# Altium PCB auto-psu.PcbDoc
Units mm, origin at the board's own origin, x right, y up, seen from the top; angles counter-clockwise.
Board outline 120 x 82.5 mm, 2 copper layers (Top Layer, Bottom Layer); 47 components, 30 nets, 121 pads, 1 vias.
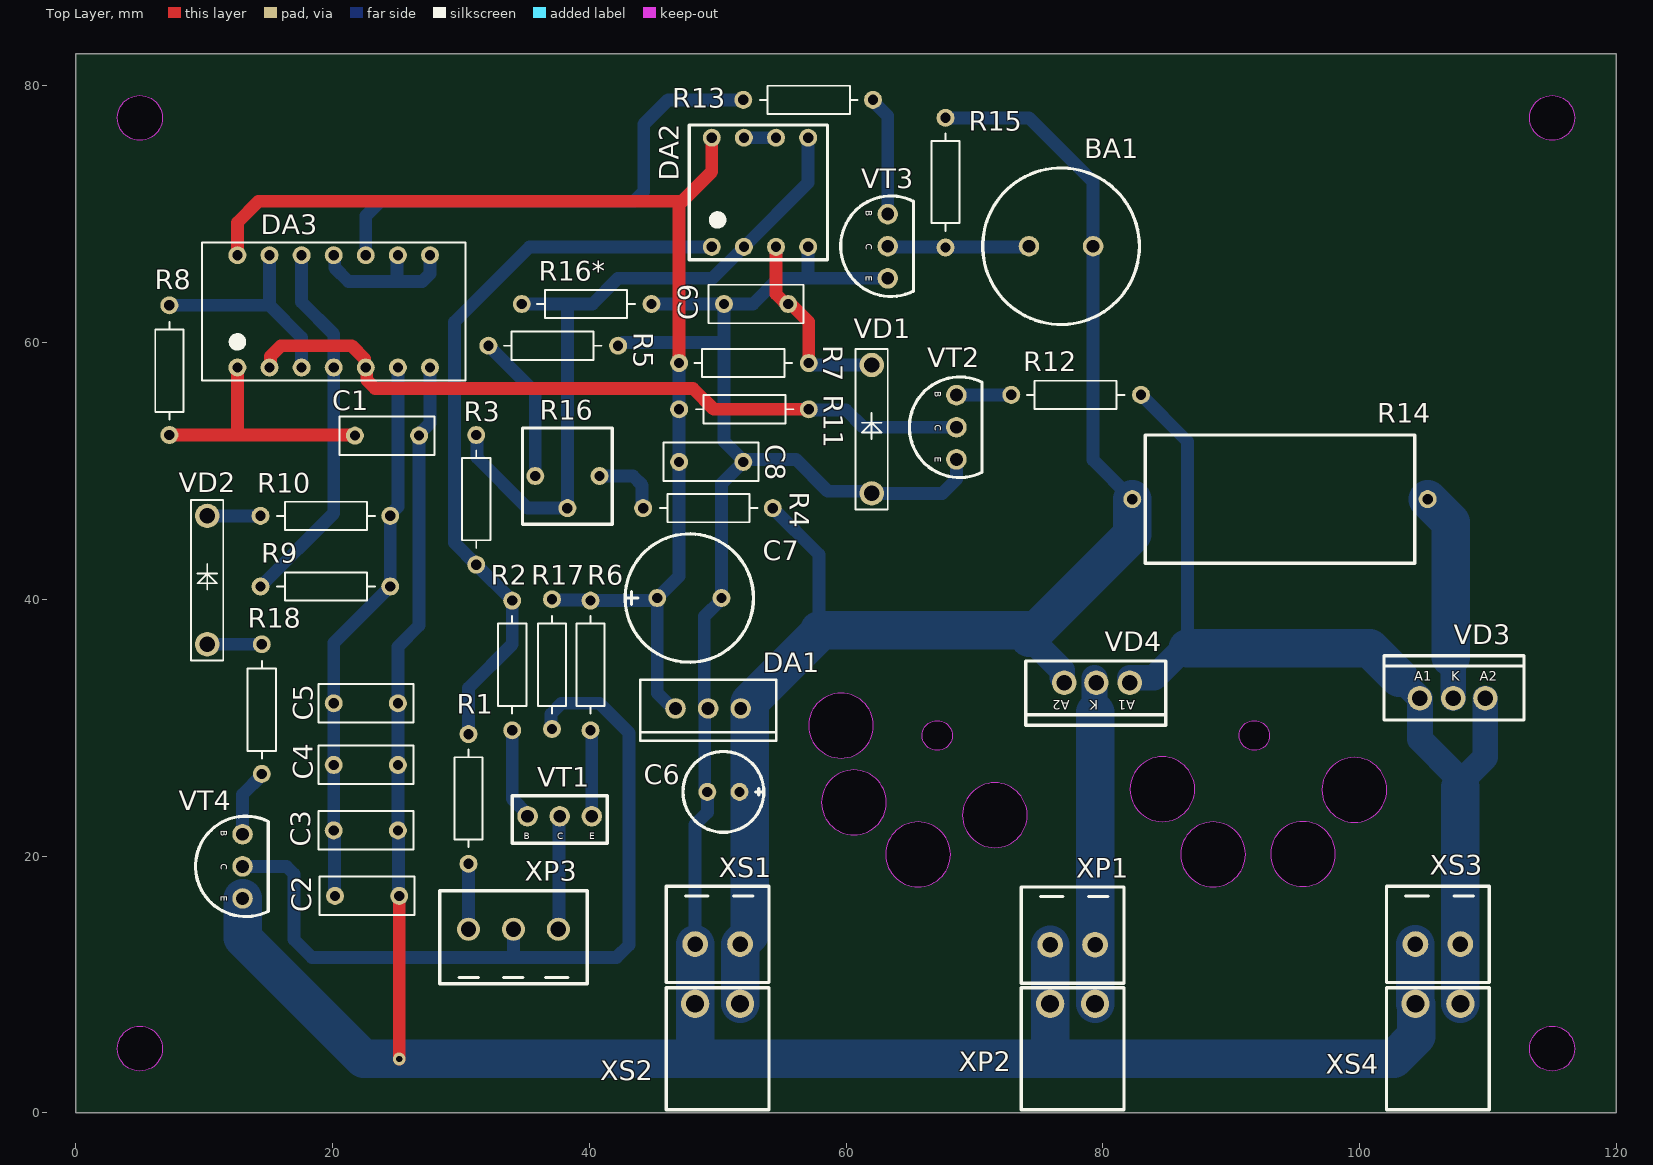
[diagram p0: Top Layer view]
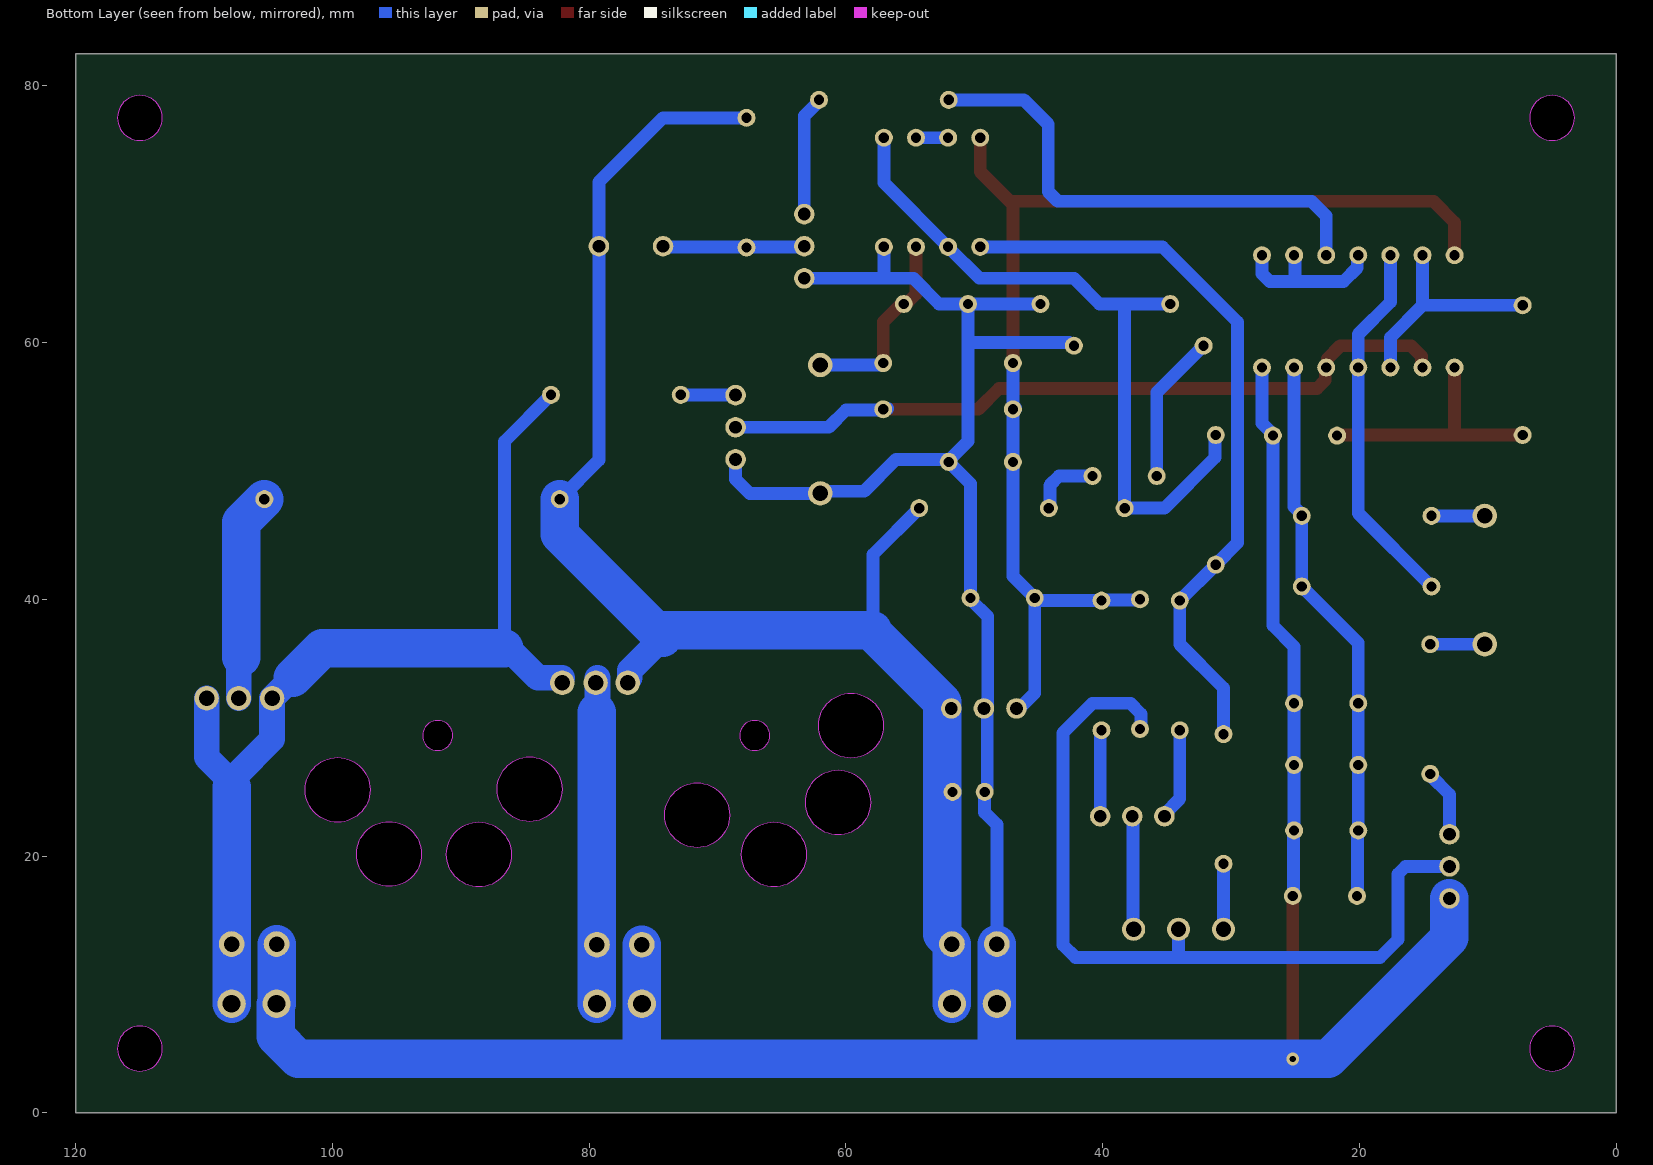
[diagram p1: Bottom Layer view, seen from below]
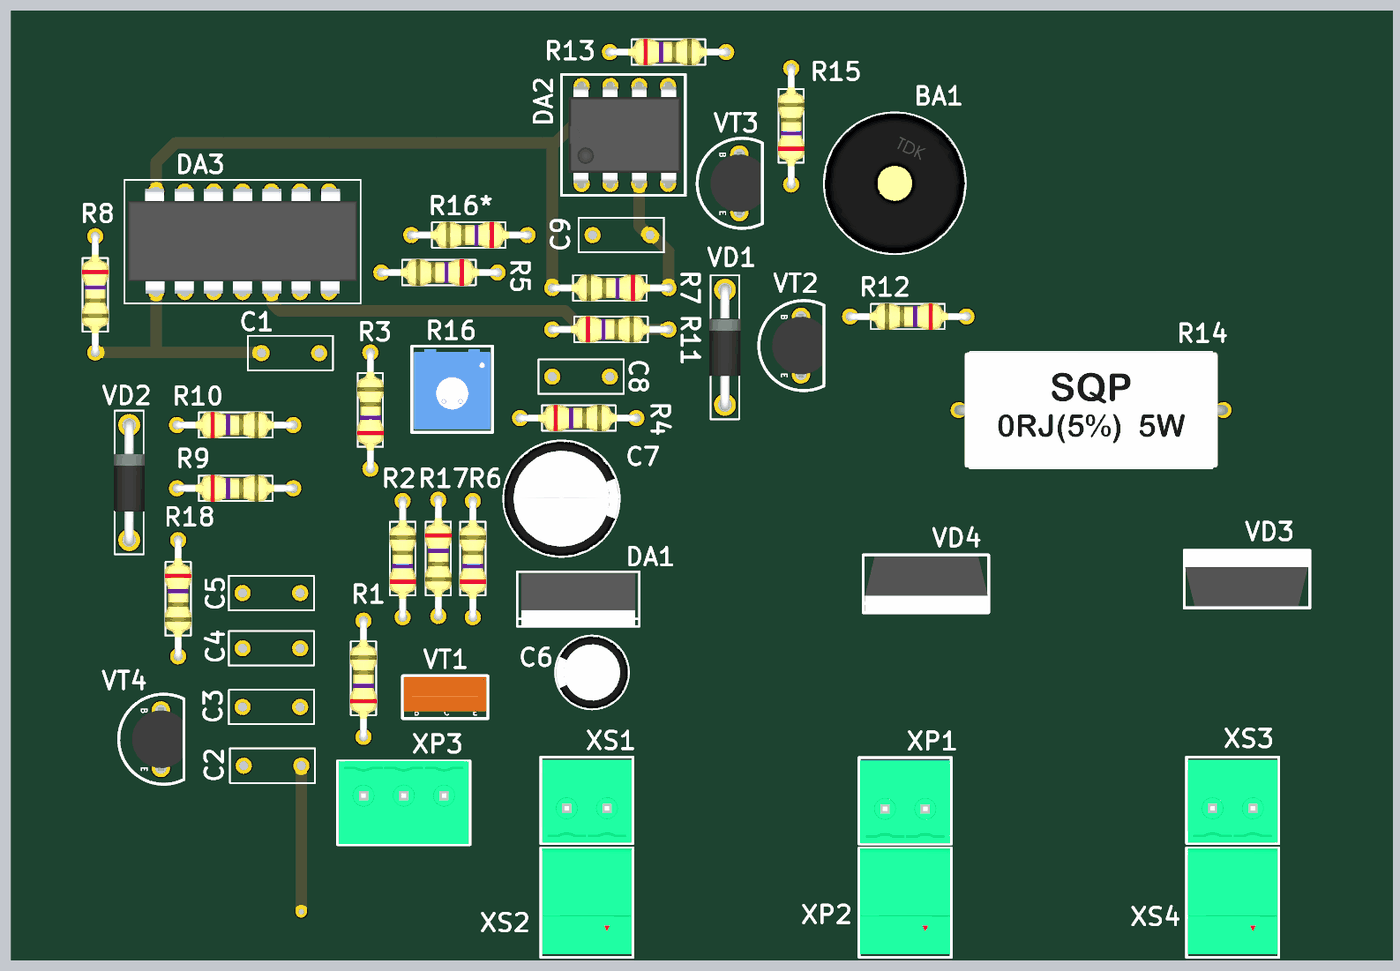
[diagram p2: 3D render of the assembled board from above, using the file's embedded part models]

## Layer stack, top to bottom
Top Solder: solder mask 0.0102, Solder Resist, Dk 3.5
Top Layer: signal copper 0.0356
Dielectric 1: dielectric 0.32, FR-4, Dk 4.8
Bottom Layer: signal copper 0.0356
Bottom Solder: solder mask 0.0102, Solder Resist, Dk 3.5

## Board outline
0,0 120,0 120,82.5 0,82.5
cut-out: 99.591,27.683 ccw(c99.591,25.158) 97.066,25.158 ccw(c99.591,25.158) 99.591,22.633 ccw(c99.591,22.633) 99.591,22.633 ccw(c99.591,25.158) 102.116,25.158 ccw(c99.591,25.158)
cut-out: 95.591,22.683 ccw(c95.591,20.158) 93.066,20.158 ccw(c95.591,20.158) 95.591,17.633 ccw(c95.591,17.633) 95.591,17.633 ccw(c95.591,20.158) 98.116,20.158 ccw(c95.591,20.158)
cut-out: 88.591,22.658 ccw(c88.591,20.133) 86.066,20.133 ccw(c88.591,20.133) 88.591,17.608 ccw(c88.591,17.608) 88.591,17.608 ccw(c88.591,20.133) 91.116,20.133 ccw(c88.591,20.133)
cut-out: 84.641,27.733 ccw(c84.641,25.208) 82.116,25.208 ccw(c84.641,25.208) 84.641,22.683 ccw(c84.641,22.683) 84.641,22.683 ccw(c84.641,25.208) 87.166,25.208 ccw(c84.641,25.208)
cut-out: 71.591,25.708 ccw(c71.591,23.183) 69.066,23.183 ccw(c71.591,23.183) 71.591,20.658 ccw(c71.591,20.658) 71.591,20.658 ccw(c71.591,23.183) 74.116,23.183 ccw(c71.591,23.183)
cut-out: 65.616,22.658 ccw(c65.616,20.133) 63.091,20.133 ccw(c65.616,20.133) 65.616,17.608 ccw(c65.616,17.608) 65.616,17.608 ccw(c65.616,20.133) 68.141,20.133 ccw(c65.616,20.133)
cut-out: 60.616,26.708 ccw(c60.616,24.183) 58.091,24.183 ccw(c60.616,24.183) 60.616,21.658 ccw(c60.616,21.658) 60.616,21.658 ccw(c60.616,24.183) 63.141,24.183 ccw(c60.616,24.183)
cut-out: 59.616,32.683 ccw(c59.616,30.158) 57.091,30.158 ccw(c59.616,30.158) 59.616,27.633 ccw(c59.616,27.633) 59.616,27.633 ccw(c59.616,30.158) 62.141,30.158 ccw(c59.616,30.158)
cut-out: 90.627,29.38 cw(c91.802,29.38) 91.802,30.555 cw(c91.802,30.555) 91.802,30.555 cw(c91.802,29.38) 92.977,29.38 cw(c91.827,29.38) 91.827,28.23 cw(c91.815,28.243) 91.802,28.23 cw(c91.79,29.393)
cut-out: 65.927,29.38 cw(c67.102,29.38) 67.102,30.555 cw(c67.102,30.555) 67.102,30.555 cw(c67.102,29.38) 68.277,29.38 cw(c67.127,29.38) 67.127,28.23 cw(c67.115,28.243) 67.102,28.23 cw(c67.09,29.393)
cut-out: 3.25,77.5 cw(c5,77.5) 5,79.25 cw(c5,77.5) 6.75,77.5 cw(c5,77.5) 5,75.75 cw(c5,77.5)
cut-out: 113.25,77.5 cw(c115,77.5) 115,79.25 cw(c115,77.5) 116.75,77.5 cw(c115,77.5) 115,75.75 cw(c115,77.5)
cut-out: 113.25,5 cw(c115,5) 115,6.75 cw(c115,5) 116.75,5 cw(c115,5) 115,3.25 cw(c115,5)
cut-out: 3.25,5 cw(c5,5) 5,6.75 cw(c5,5) 6.75,5 cw(c5,5) 5,3.25 cw(c5,5)

## Design rules (kind name [scope] priority, off if disabled: settings)
Clearance [All] p1: gap=0.25 ignorepadtopadclearanceinfootprint=FALSE
PolygonConnect [All] p1: connectstyle=Relief reliefconductorwidth=0.254 reliefentries=4 polygonreliefangle="90 Angle" airgapwidth=0.254
RoutingVias [All] p1: holewidth=0.711 width=1.27 viastyle="Through Hole" minholewidth=0.711 minwidth=1.27 maxholewidth=0.711 maxwidth=1.27
SolderMaskExpansion [All] p1: expansion=0.102 istentingtop=FALSE
Width [All] p1: maxlimit=3 minlimit=0.5 preferedwidth=1
30 further rules are at their usual default settings.

## Components (designator, comment, footprint, x,y, rotation, side; value= is the part's Value field where it differs from the comment)
BA1 "PS1240P02BT" "BA_PS12 BUZZER" 76.75,67.5 r180 top
C1 "0.33 µF" C_MLCC 24.25,52.75 r180 top
C2 "10 µF" C_MLCC 22.7,16.9 r180 top
C3 "10 µF" C_MLCC 22.6,22 r180 top
C4 "10 µF" C_MLCC 22.6,27.1 r180 top
C5 "10 µF" C_MLCC 22.6,31.9 r180 top
C6 "100 µF" "C+_6,3 MM" 50.45,25 r0 top
C7 "1000 µF" C+_10MM 47.8,40.1 r180 top
C8 "0.33 µF" C_MLCC 49.5,50.7 r180 top
C9 "0.33 µF" C_MLCC 53,63 r0 top
DA1 "LM7812CT" DD_TO-220 49.26,31.5 r180 top
DA2 "LM358L-D08-T" DA_DIP8 53.3,71.7 r90 top
DA3 "CD4093BE" DA_DIP14 20.1,62.3 r90 top
R1 "6.2 kΩ" R_CF-25_C1-4 30.6,24.5 r90 top
R2 "6.2 kΩ" R_CF-25_C1-4 34,34.9 r90 top
R3 "33 kΩ" R_CF-25_C1-4 31.2,47.8 r90 top
R4 "4.3 kΩ" R_CF-25_C1-4 49.3,47.1 r0 top
R5 "6.2 kΩ" R_CF-25_C1-4 37.15,59.75 r180 top
R6 "3.6 kΩ" R_CF-25_C1-4 40.1,34.9 r90 top
R7 "6.2 kΩ" R_CF-25_C1-4 52,58.4 r180 top
R8 "2.7 kΩ" R_CF-25_C1-4 7.3,57.8 r270 top
R9 "820 kΩ" R_CF-25_C1-4 19.5,41 r0 top
R10 "20 kΩ" R_CF-25_C1-4 19.5,46.5 r0 top
R11 "10 kΩ" R_CF-25_C1-4 52.1,54.8 r0 top
R12 "36 kΩ" R_CF-25_C1-4 77.875,55.925 r180 top
R13 "51 kΩ" R_CF-25_C1-4 57.1,78.9 r0 top
R14 "3.9 Ω" "R_SQP 5W" 93.8,47.8 r180 top
R15 "6.2 kΩ" R_CF-25_C1-4 67.75,72.5 r90 top
R16 "5 kΩ" R_3362P(POT) 38.3,49.6 r0 top
R16* "*" R_CF-25_C1-4 39.75,63 r180 top
R17 "2.7 kΩ" R_CF-25_C1-4 37.1,34.9 r270 top
R18 "51 kΩ" R_CF-25_C1-4 14.5,31.4 r270 top
VD1 "1N4735A" VD_DO-41 62,53.25 r90 top
VD2 "1N4001" VD_DO-41 10.25,41.5 r90 top
VD3 "STPS2045CT" VD_TO-220AB 107.3,33 r0 top
VD4 "STPS2045CT" "VD_TO-220AB (HIGH)" 79.5,32.8 r180 top
VT1 "KT361B" VT_KT-13 35.2,23.1 r0 top
VT2 "KT315V1" VT_TO-92 68.6,53.4 r270 top
VT3 "KT315V1" VT_TO-92 63.25,67.5 r270 top
VT4 "KT315V1" VT_TO-92 13,19.2 r270 top
XP1 "15EDGVC-3.5-02" X_15EDGVC_2P 77.65,13.85 r0 top
XP2 "15EDGRC-3.5-02" X_15EDGRC_2P 77.65,6 r0 top
XP3 "15EDGVC-3.5-03P-14-00AH" X_15EDGVC_3P 34.1,13.55 r180 top
XS1 "15EDGVC-3.5-02" X_15EDGVC_2P 50,13.9 r0 top
XS2 "15EDGRC-3.5-02" X_15EDGRC_2P 50,6 r0 top
XS3 "15EDGVC-3.5-02" X_15EDGVC_2P 106.1,13.9 r0 top
XS4 "15EDGRC-3.5-02" X_15EDGRC_2P 106.1,6 r0 top

## Footprints (in the part's own frame and the unit in brackets; to place one, negate y for a bottom-side part, rotate by r counter-clockwise, add the part's x,y. Pads: shape width x height; smd on the part's side, far side on the other; paste and mask are expansions set on the pad)
"BA_PS12 BUZZER" [mm]
  round 1.6 hole 1: 1(-2.5,0) 2(2.5,0)
  silkscreen extent -6.1,-6.1 6.1,6.1, body extent -6.1,-6.1 6.1,6.1, height 9
"C+_6,3 MM" [mm]
  round 1.4 hole 0.8: 1(-1.25,0) 2(1.25,0)
  silkscreen extent -3.15,-3.15 3.15,3.15, body extent -3.15,-3.14 3.15,3.14, height 11
C+_10MM [mm]
  round 1.4 hole 0.8: 1(-2.5,0) 2(2.5,0)
  silkscreen extent -5,-5 5,5, body extent -5,-5 5,5, height 16
C_MLCC [mm]
  round 1.4 hole 0.8: 1(-2.5,0) 2(2.5,0)
  silkscreen extent -3.7,-1.5 3.7,1.5, body extent -2.79,-1.25 2.79,1.25, height 7.5
DA_DIP8 [mm]
  round 1.4 hole 0.8 unplated: 1(-4.25,3.75) 2(-4.25,1.25) 3(-4.25,-1.25) 4(-4.25,-3.75) 5(4.25,-3.75) 6(4.25,-1.25) 7(4.25,1.25) 8(4.25,3.75)
  silkscreen extent -5.25,-5.25 5.25,5.5, body extent -4.57,-4.9 4.57,4.9, height 4.6
DA_DIP14 [mm]
  round 1.4 hole 0.8 unplated: 1(-4.25,7.5) 2(-4.25,5) 3(-4.25,2.5) 4(-4.25,0) 5(-4.25,-2.5) 6(-4.25,-5) 7(-4.25,-7.5) 8(4.5,-7.5) 9(4.5,-5) 10(4.5,-2.5) 11(4.5,0) 12(4.5,2.5) 13(4.5,5) 14(4.5,7.5)
  silkscreen extent -5.25,-10.25 5.5,10.25, body extent -4.66,-9.97 5,9.97, height 3.51
DD_TO-220 [mm] "TO, Thru-Hole, Vertical, Heatsink Mounted; 3 In-Line Leads; Pitch 2.54 mm"
  round 1.6 hole 1: 1(-2.54,0) 2(0,0) 3(2.54,0)
  silkscreen extent -5.3,-2.25 5.3,2.5, body extent -4.95,-2.1 4.95,2.4, height 19.8
R_3362P(POT) [mm]
  round 1.4 hole 0.8: 1(-2.5,0) 2(2.5,0) 3(0,-2.5)
  silkscreen extent -3.5,-3.75 3.5,3.75, body extent -3.3,-3.49 3.3,3.49, height 4.56
R_CF-25_C1-4 [mm]
  round 1.4 hole 0.8: 1(-5.1,0) 2(5,0)
  silkscreen extent -3.8,-1.1 3.8,1.1, body extent -5.47,-1.16 5.3,1.16, height 2.93
"R_SQP 5W" [mm]
  round 1.4 hole 0.8: 1(-11.5,0) 2(11.5,0)
  silkscreen extent -10.5,-5 10.5,5, body extent -11.88,-5 11.88,5, height 10
VD_DO-41 [mm]
  round 1.9 hole 1.2: 1(-5,0) 2(5,0)
  silkscreen extent -6.25,-1.25 6.25,1.25, body extent -5.48,-1.34 5.48,1.34, height 2.8
VD_TO-220AB [mm]
  round 1.9 hole 1.2: 1(-2.6,-0.7) 2(0,-0.7) 3(2.5,-0.7)
  silkscreen extent -5.4,-2.4 5.5,2.6, body extent -5.35,-2.25 5.35,2.56, height 21.58
"VD_TO-220AB (HIGH)" [mm]
  round 1.9 hole 1.2: 1(-2.6,-0.7) 2(0,-0.7) 3(2.5,-0.7)
  silkscreen extent -5.4,-2.4 5.5,2.6, body extent -5.35,-2.25 5.35,2.56, height 28.58
VT_KT-13 [mm]
  round 1.6 hole 1: 1(0,0) 2(2.5,0) 3(5,0)
  silkscreen extent -1.2,-2.1 6.2,1.6, body extent -1.1,-1.5 6.1,1.5, height 7
VT_TO-92 [mm]
  round 1.6 hole 1: 1(-2.5,0) 2(0,0) 3(2.5,0)
  silkscreen extent -3.91,-3.66 3.91,2, body extent -2.75,-2.5 2.75,1.85, height 8.2
X_15EDGRC_2P [mm]
  round 2.2 hole 1.4: 1(1.75,2.5) 2(-1.75,2.5)
  silkscreen extent -4,-5.75 4,3.75, body extent -3.9,-5.5 3.9,3.7, height 7.2
X_15EDGVC_2P [mm]
  round 2 hole 1.2: 1(1.75,-0.75) 2(-1.75,-0.75)
  silkscreen extent -4,-3.75 4,3.75, body extent -3.9,-3.7 3.9,3.5, height 9.2
X_15EDGVC_3P [mm]
  round 1.8 hole 1.2: 1(-3.5,-0.75) 2(0,-0.75) 3(3.5,-0.75)
  silkscreen extent -5.75,-3.75 5.75,3.5, body extent -5.65,-3.75 5.65,3.45, height 9.2

## Part data
BA1: library part BA_Piezo_Buzzer, "Piezoelectric sounder"
C1 C2 C3 C4 C5 C8 C9: library part C_NonPolarized, "Capacitor, 50 V, 10%"
C6: library part C_Polarized, "Capacitor, 35 V, 20%"
C7: library part C_Polarized, "Capacitor, 16 V, 20%"
DA1: library part DA_Voltage_Regulator, "Linear voltage regulator, 12 V"
DA2: library part DA_LM358, "Dual operational amplifier"
DA3: library part DD_CD4093BE, "Quad two-input Schmitt-trigger NAND gate"
R1 R2 R3 R4 R5 R6 R7 R8 R9 R10 R11 R12 R13 R15 R17 R18: library part R_RESISTOR, "Carbon-film resistor, 0.25 W, 5%"
R14: library part R_RESISTOR, "Wirewound resistor, 5 W, 5%"
R16: library part R_Potentiometer, "Potentiometer"
R16*: library part R_RESISTOR, "Fixed resistor"
VD1: library part VD_Zener, "Zener diode, 6.2 V"
VD2: library part VD_Diode, "Rectifier diode, 1 A, 50 V"
VD3 VD4: library part VD_Dual_Schottky, "Dual Schottky rectifier, 2 x 10 A, 45 V"
VT1: library part VT_Bipolar-PNP, "PNP bipolar transistor"
VT2 VT3 VT4: library part VT_Bipolar-NPN, "NPN bipolar transistor"
XP1 XP2: library part XP_Connector_2Pin, "2-pin connector (plug)"
XP3: library part XP_Connector_3Pin, "3-pin connector (plug)"
XS1 XS2 XS3 XS4: library part XS_Connector_2Pin, "2-pin connector (socket)"

## Via types
v1: diameter 1, hole 0.5, Top Layer to Bottom Layer, 1 vias

## Nets (pads, with @x,y where several pads share a name; then routed paths per layer and width w, separated by ;. In a path a pad name is that pad's centre, name@x,y a point inside that pad or via, vN(x,y) a via of type N, cw(c..) or ccw(c..) an arc to the next point about the centre after c; other vN are vias at no path point)
GND: C1.1 C2.1 C3.1 C4.1 C5.1 C6.1 C7.1 C8.1 C9.1 DA1.2 DA2.4 DA3.7 R5.1 R16*.1 VD1.1 VT2.3 VT3.3 VT4.3 XP1.2 XP2.2 XS1.2 XS2.2 XS3.2 XS4.2 | length 281.1
  Top Layer w1: v1(25.2,4.2) C2.1
  Bottom Layer w1: C2.1 25.15,16.95 25.15,21.95 C3.1 C4.1 C5.1 25.1,36.3 26.75,37.95 C1.1 26.75,52.858 27.6,53.708 DA3.7 ; R5.1 42.358,59.75 42.608,60 50.5,60 ; R16*.1 C9.1 ; XS1.2 48.25,22.45 49.2,23.4 49.2,25.108 49,25.308 49,31.078 49.26,31.338 DA1.2 ; DA1.2@48.96,31.588 48.96,38.652 50.3,39.992 C7.1 50.3,49 C8.1 52,50.808 50.5,52.308 50.5,60 ; C8.1@52.2,50.9 56.1,50.9 58.578,48.422 61.828,48.422 VD1.1 67.5,48.25 68.6,49.35 VT2.3 ; DA2.4 57.05,65.05 57,65 ; VT3.3 57,65 ; 50.5,60 C9.1 ; C9.1 52.75,63 54.75,65 57,65
  Bottom Layer w3: VT4.3 13,13.645 22.445,4.2 v1(25.2,4.2) 47.85,4.2 ; XS1.2 XS2.2 48.25,4.6 47.85,4.2 ; XP1.2 XP2.2 75.9,4.3 75.8,4.2 ; XS3.2 XS4.2 104.407,8.443 104.407,5.957 102.65,4.2 75.8,4.2 ; 47.85,4.2 75.8,4.2
NetBA1_1: BA1.1 C6.2 DA1.1 R4.2 R14.2 R15.2 VD4.3 XS1.1 XS2.1 | length 117.4
  Bottom Layer w1: R4.2 57.9,43.5 57.9,37.6 ; R15.2 74.25,77.5 79.25,72.5 BA1.1 79.25,50.85 R14.2
  Bottom Layer w2: 74.05,37.8 74.05,37.6 74.05,37.25 74.275,37.025 76.85,34.45 VD4.3@76.85,33.9
  Bottom Layer w3: XS2.1 XS1.1 52.5,13.9 ; 52.5,14 52.5,32 57.9,37.4 57.9,37.6 74.05,37.6 ; 74.275,37.025 82.3,45.05 R14.2
NetBA1_2: BA1.2 R15.1 VT3.2 | length 11.1
  Bottom Layer w1: VT3.2 63.3,67.45 67.7,67.45 R15.1 67.8,67.45 74.2,67.45 BA1.2
NetC1_2: C1.2 DA3.1 R8.2 | length 19.8
  Top Layer w1: R8.2 12.3,52.8 ; DA3.1 12.6,53.1 12.3,52.8 ; C1.2@21.7,52.8 12.3,52.8
NetC2_2: C2.2 C3.2 C4.2 C5.2 DA3.6 R9.2 R10.2 | length 43.3
  Bottom Layer w1: C2.2 20.15,16.95 20.15,21.95 C3.2 C4.2 C5.2 20.1,36.6 R9.2 R10.2 24.5,46.608 25.1,47.208 DA3.6
NetC7_2: C7.2 C8.2 DA1.3 DA2.8 DA3.14 R6.2 R7.2 R11.1 R17.1 | length 92.8
  Top Layer w1: DA3.14 12.6,69.35 14.25,71 47.25,71 ; R7.2 47,70.75 47.25,71 ; DA2.8 49.55,73.3 47.25,71
  Bottom Layer w1: R17.1 37.15,39.95 40.05,39.95 R6.2 44.992,39.9 45.192,40.1 C7.2 ; DA1.3@46.42,31.75 46.258,31.75 45.3,32.708 C7.2 ; R11.1@46.8,54.8 46.8,54.908 47,55.108 R7.2 ; R11.1 47,41.8 C7.2
NetC9_2: C9.2 DA2.3 R7.1 VD1.2 | length 15.2
  Top Layer w1: DA2.3 54.55,63.786 55.136,63.2 55.192,63.2 55.392,63 C9.2 ; C9.2@55.6,63.1 57.1,61.6 R7.1
  Bottom Layer w1: R7.1 57.208,58.4 57.358,58.25 VD1.2
NetDA2_1: DA2.1 R1.2 R2.2 R3.1 | length 57.8
  Bottom Layer w1: R1.2 30.6,33.1 34,36.5 R2.2 R3.1 29.5,44.4 29.5,61.6 35.35,67.45 DA2.1
NetDA2_2: DA2.2 DA2.5 R3.2 R16*.2 R16.3 | length 56.1
  Bottom Layer w1: R3.2 31.25,52.75 31.25,51.05 35.2,47.1 R16.3 38.3,62.95 38.25,63 ; R16*.2 38.25,63 ; DA2.5 57.05,72.45 DA2.2 49.6,65 42.25,65 40.25,63 38.25,63
NetDA2_6: DA2.6 DA2.7 | length 2.5
  Bottom Layer w1: DA2.7 DA2.6
NetDA3_2: DA3.2 DA3.5 R11.2 VT2.2 | length 57.5
  Top Layer w1: DA3.2 15.177,58.127 15.177,58.927 16,59.75 21.5,59.75 DA3.5@22.523,58.727 ; DA3.5 22.677,57.973 22.677,57.073 23.325,56.425 48.075,56.425 49.7,54.8 R11.2@56.9,54.8
  Bottom Layer w1: R11.2@56.75,54.85 R11.2@56.8,54.8 ; R11.2@56.95,54.75 60,54.75 61.35,53.4 VT2.2
NetDA3_3: DA3.3 DA3.13 R8.1 | length 17.5
  Bottom Layer w1: R8.1 14.9,62.9 15,63 ; DA3.13 15.1,62.9 17.6,60.4 DA3.3
NetDA3_4: DA3.4 DA3.12 R9.1 | length 29.2
  Bottom Layer w1: R9.1 20.1,46.7 DA3.4 20.1,60.65 17.6,63.15 DA3.12
NetDA3_8: DA3.8 DA3.9 DA3.11 | length 12.7
  Bottom Layer w1: DA3.11 20.177,66.723 20.177,65.823 21.25,64.75 25,64.75 ; DA3.9 25.023,66.723 25.023,64.773 25,64.75 ; DA3.8 27.6,65.35 27,64.75 25,64.75
NetDA3_10: DA3.10 R13.1 | length 39.3
  Bottom Layer w1: DA3.10 22.6,69.85 23.75,71 43.5,71 44.25,71.75 44.25,77 46.15,78.9 R13.1
NetR1_1: R1.1 XP3.3 | length 5.1
  Bottom Layer w1: XP3.3 R1.1
NetR2_1: R2.1 VT1.1 | length 7.2
  Bottom Layer w1: R2.1 34,24.462 35.2,23.262 VT1.1
NetR4_1: R4.1 R16.2 | length 5.4
  Bottom Layer w1: R16.2 43.4,49.6 44.123,48.877 44.123,47.177 R4.1
NetR5_2: R5.2 R16.1 | length 11.7
  Bottom Layer w1: R5.2 35.8,56.1 R16.1
NetR6_1: R6.1 VT1.3 | length 6.7
  Bottom Layer w1: R6.1 40.1,29.692 40.2,29.592 VT1.3
NetR10_1: R10.1 VD2.2 | length 4.2
  Bottom Layer w1: VD2.2@10.21,46.5 R10.1
NetR12_1: R12.1 VD3.1 VD3.3 VD4.1 XS3.1 XS4.1 | length 77.3
  Bottom Layer w1: R12.1 86.6,52.3 86.6,36.2
  Bottom Layer w2: VD4.1@82.1,33.9 84,33.9 86.1,36 ; 103.1,33.9 VD3.1 104.7,29.1 107.5,26.3 ; 107.742,25.642 109.8,27.7 VD3.3
  Bottom Layer w3: 86.6,36.2 100.8,36.2 103.1,33.9 ; XS4.1 XS3.1 107.85,25.35
NetR12_2: R12.2 VT2.1 | length 4.3
  Bottom Layer w1: VT2.1 68.612,55.912 72.862,55.912 R12.2
NetR13_2: R13.2 VT3.1 | length 9.4
  Bottom Layer w1: R13.2 62.1,78.792 63.25,77.642 VT3.1
NetR14_1: R14.1 VD3.2 | length 16.3
  Bottom Layer w2: 107.1,35.5 107.3,35.3 VD3.2
  Bottom Layer w3: R14.1 107.1,46 107.1,35.5
NetR17_2: R17.2 VT4.2 XP3.2 | length 63.9
  Bottom Layer w1: VT4.2 16.414,19.2 17,18.614 17,13.5 18.4,12.1 34.1,12.1 ; XP3.2@34.1,14.373 34.1,12.1 ; R17.2@37.1,30.008 R17.2 37.023,29.977 37.023,31.077 37.847,31.9 40.8,31.9 43.1,29.6 43.1,13.086 42.114,12.1 34.1,12.1
NetR18_1: R18.1 VD2.1 | length 4.2
  Bottom Layer w1: VD2.1 R18.1
NetR18_2: R18.2 VT4.1 | length 5.3
  Bottom Layer w1: VT4.1 13,24.792 14.5,26.292 R18.2
NetVD4_2: VD4.2 XP1.1 XP2.1 | length 25.4
  Bottom Layer w2: VD4.2@79.35,33.9 79.35,31.25 79.4,31.2
  Bottom Layer w3: XP2.1 79.4,31.2
NetVT1_2: VT1.2 XP3.1 | length 8.8
  Bottom Layer w1: XP3.1 37.65,14.35 37.65,23.05 VT1.2

## Silkscreen, mask and mechanical layers (free items; w line width, h text height)
Mechanical 1:
  circle w0.254: c99.604,25.166 r2.5
  circle w0.254: c95.604,20.166 r2.5
  circle w0.254: c88.604,20.166 r2.5
  circle w0.254: c84.604,25.166 r2.5
  circle w0.254: c71.604,23.166 r2.5
  circle w0.254: c65.604,20.166 r2.5
  circle w0.254: c60.604,24.166 r2.5
  circle w0.254: c59.604,30.166 r2.5
  circle w0.254: c91.8,29.4 r1.15
  circle w0.254: c67.1,29.4 r1.15
  circle w0.254: c5,77.5 r1.75
  circle w0.254: c115,77.5 r1.75
  circle w0.254: c115,5 r1.75
  circle w0.254: c5,5 r1.75

## Text inside footprints (layer, text, board x,y; h text height)
VD3: Top Overlay "K" at 107.154,33.654 h0.75; Top Overlay "A2" at 109.354,33.654 h0.75; Top Overlay "A1" at 104.254,33.654 h0.75
VD4: Top Overlay "K" at 79.646,32.146 h0.75 r180; Top Overlay "A2" at 77.446,32.146 h0.75 r180; Top Overlay "A1" at 82.546,32.146 h0.75 r180
VT1: Top Overlay "B" at 34.9,21.3 h0.5; Top Overlay "C" at 37.5,21.3 h0.5; Top Overlay "E" at 40,21.3 h0.5
VT2: Top Overlay "E" at 66.9,51.1 h0.5 r270; Top Overlay "C" at 66.9,53.6 h0.5 r270; Top Overlay "B" at 66.9,56.2 h0.5 r270
VT3: Top Overlay "E" at 61.55,65.2 h0.5 r270; Top Overlay "C" at 61.55,67.7 h0.5 r270; Top Overlay "B" at 61.55,70.3 h0.5 r270
VT4: Top Overlay "B" at 11.3,22 h0.5 r270; Top Overlay "C" at 11.3,19.4 h0.5 r270; Top Overlay "E" at 11.3,16.9 h0.5 r270